# Altium PCB stm32‑smart‑charger.PcbDoc
Units mil, origin at the board's own origin, x right, y up, seen from the top; angles counter-clockwise.
Board outline 3929.13 x 3929.13 mil, 2 copper layers (Top Layer, Bottom Layer); 31 components, 48 nets, 185 pads, 0 vias.
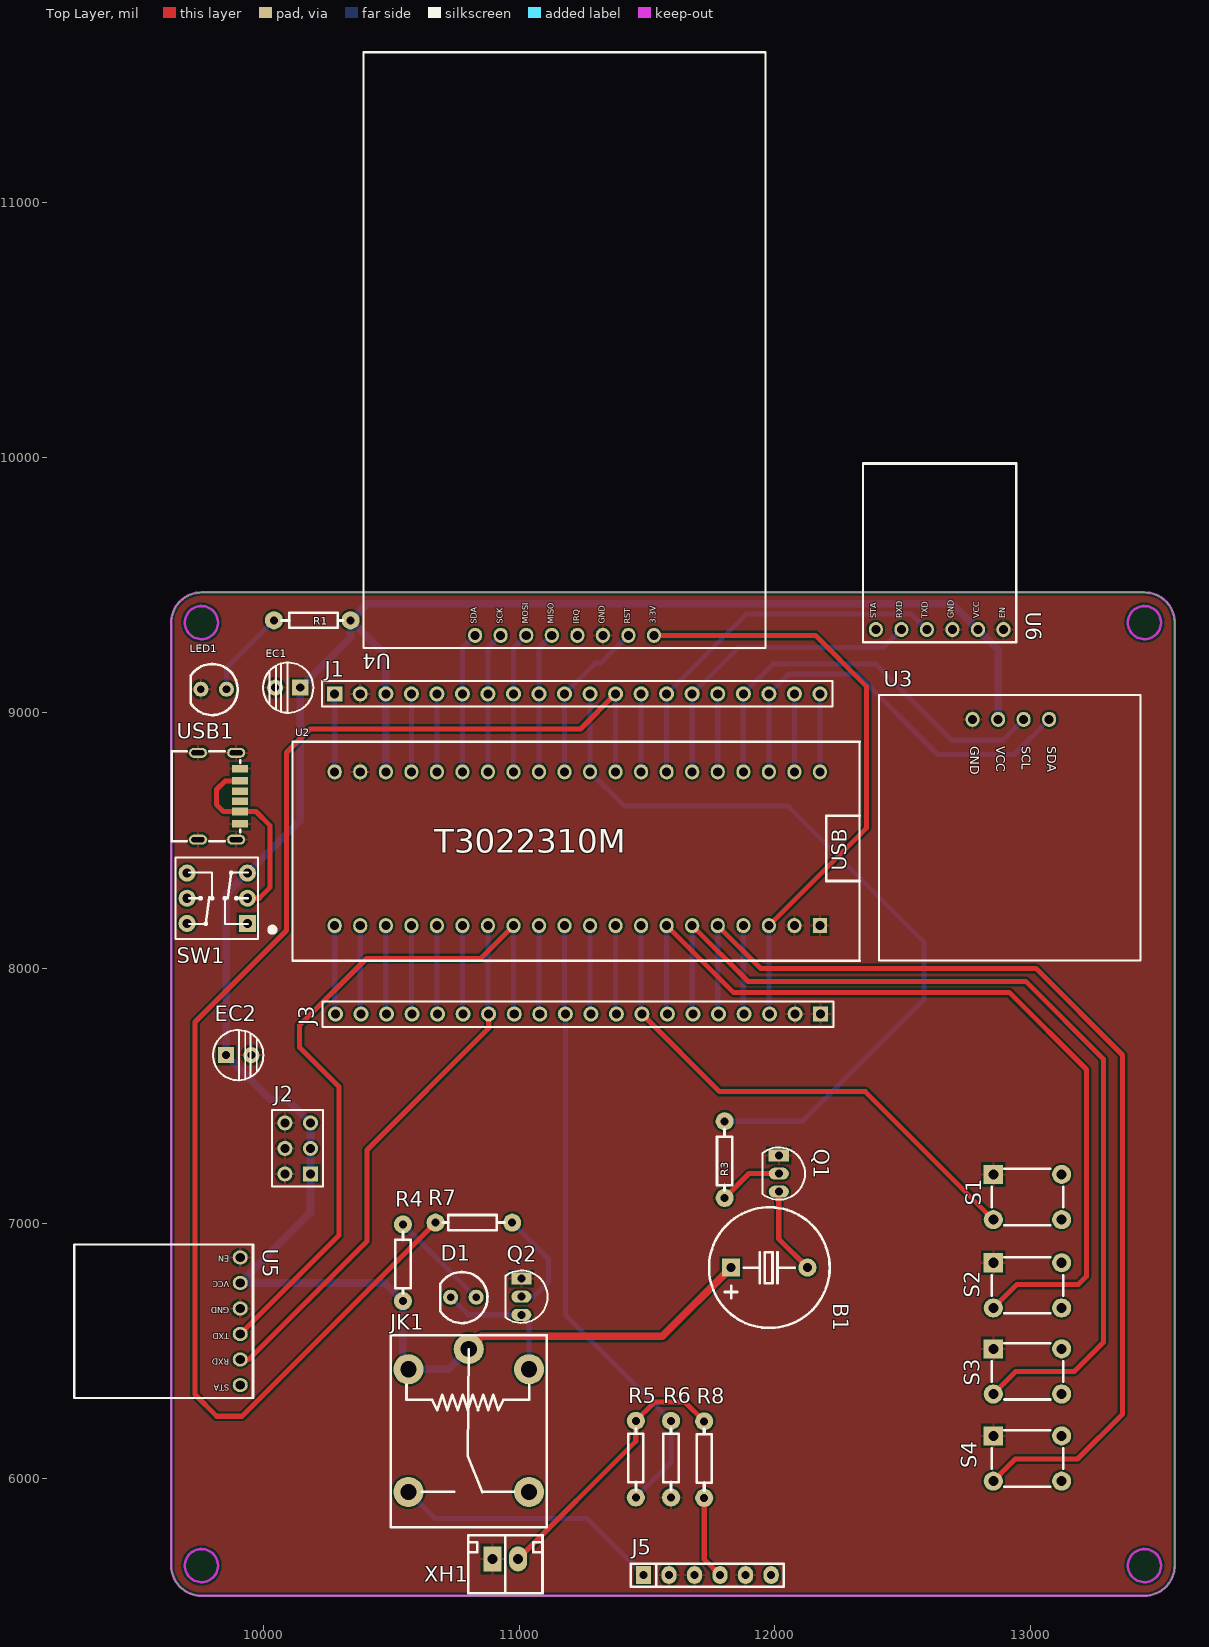
[diagram p0: Top Layer view]
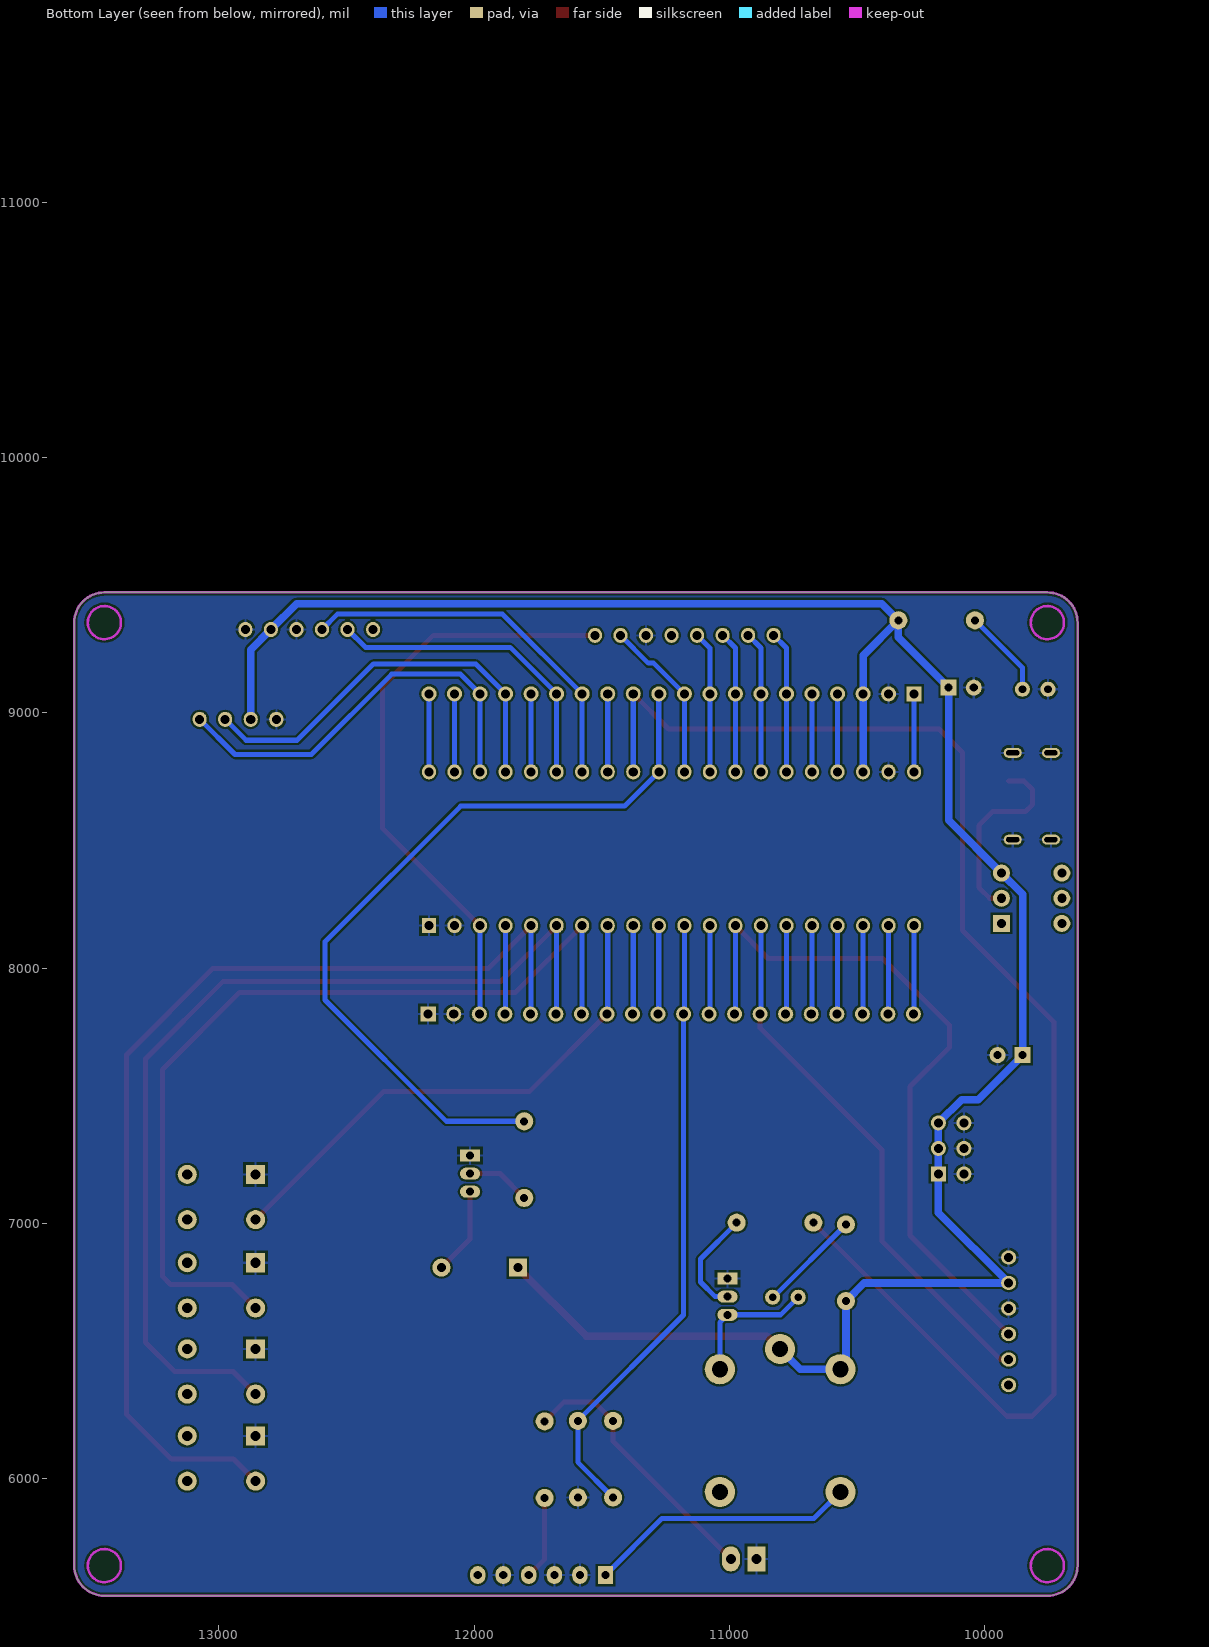
[diagram p1: Bottom Layer view, seen from below]

## Layer stack, top to bottom
Top Layer: signal copper 1.4
Dielectric: dielectric 12.6, FR-4, Dk 4.8
Bottom Layer: signal copper 1.4

## Board outline
9637,5660.11 9637,9353.02 cw(c9755.11,9353.02) 9755.11,9471.13 13448.02,9471.13 cw(c13448.02,9353.02) 13566.13,9353.02 13566.13,5660.11 cw(c13448.02,5660.11) 13448.02,5542 9755.11,5542 cw(c9755.11,5660.11)

## Design rules (kind name [scope] priority, off if disabled: settings)
Clearance [All] p1: gap=8
PolygonConnect [All] p1: connectstyle=Relief reliefconductorwidth=10 reliefentries=4 polygonreliefangle="90 Angle" airgapwidth=10
RoutingVias [All] p1: holewidth=11.81 width=23.62 viastyle="Through Hole" minholewidth=11.81 minwidth=23.62 maxholewidth=11.81 maxwidth=23.62
SolderMaskExpansion [All] p1: expansion=4
Width [All] p1: maxlimit=30 minlimit=20 preferedwidth=20 minimp=50.000000 maximp=50.000000 favimp=50.000000
28 further rules are at their usual default settings.

## Components (designator, comment, footprint, x,y, rotation, side; value= is the part's Value field where it differs from the comment)
B1 "BEEP" "BEEP 7.6X12X7.5" 11829,6827 r0 top
D1 "LED" LED5-BLUE 10781,6711 r180 top
EC1 "22uF" DIP-EC2.5X5X11 10142,9098 r180 top
EC2 "10uF" DIP-EC2.5X5X11 9852,7659 r0 top
J1 "" "Pin HDR1X20/2.54mm-S" 10277,9074 r0 top
J2 "Pin HDR2X3" "Pin HDR2X3/2.54mm-S" 10182,7194 r90 top
J3 "" "Pin HDR1X20/2.54mm-S" 12180,7820 r180 top
J5 "" Fe-HDR1X6/2.54-S 11486,5623 r0 top
JK1 "SRD-05VDC-SL-C" SRD-C_B 11038,6429 r270 top
LED1 "LED" LED5-BLUE 9803,9092 r180 top
Q1 "NPN" TO-92A 12016,7266 r270 top
Q2 "NPN" TO-92A 11008,6784 r270 top
R1 "1k" AXIAL0.3 10039,9362 r0 top
R3 "1K" AXIAL0.3 11804,7400 r270 top
R4 "1k" AXIAL0.3 10544,6996 r270 top
R5 "1k" AXIAL0.3 11456,5927 r90 top
R6 "1k" AXIAL0.3 11594,5927 r90 top
R7 "1k" AXIAL0.3 10972,7003 r180 top
R8 "10k" AXIAL0.3 11724,5925 r90 top
S1 "BUTTOM" DIP-6X6X5 12856,7192 r0 top
S2 "BUTTOM" DIP-6X6X5 12856,6846 r0 top
S3 "BUTTOM" DIP-6X6X5 12856,6509 r0 top
S4 "BUTTOM" DIP-6X6X5 12856,6168 r0 top
SW1 "KFT DIP-8X8" "KFT DIP-8X8" 9935,8175 r180 top
U2 "STM32F103" STM32FF103 12177,8166 r90 top
U3 "OLED" OLED 12920,8974 r270 top
U4 "RC522" RFID-RC522 11177,9303 r90 top
U5 "ECB02" ECB02 9957,6917 r180 top
U6 "SU-03T" ECB02 12946,9276 r90 top
USB1 "TYPEC-250D-BCP6" TYP-C-6 9824,8673 r270 top
XH1 "" XH2/2.54mm/180 10895,5686 r0 top

## Footprints (in the part's own frame and the unit in brackets; to place one, negate y for a bottom-side part, rotate by r counter-clockwise, add the part's x,y. Pads: shape width x height; smd on the part's side, far side on the other; paste and mask are expansions set on the pad)
AXIAL0.3 [mm]
  round 1.8 hole 0.8: 1(0,0) 2(7.62,0)
  silkscreen extent 0.76,-0.76 6.86,0.76, body extent -0.24,-1 7.86,1, height 1.25
"BEEP 7.6X12X7.5" [mm]
  rect 1.8x1.8 hole 0.9: 1(0,0)
  round 1.8 hole 0.9: 2(7.6,0)
  silkscreen extent -2.19,-6 9.81,6, body extent -2.19,-5.97 9.81,6.03, height 7.55
DIP-6X6X5 [mm]
  rect 1.9x1.9 hole 1: 1(0,0)
  round 1.9 hole 1: 2(0,-4.5) 3(6.8,-4.5) 4(6.8,0)
  silkscreen extent -0.16,-5.04 6.96,0.54, body extent -0.8,-5.24 7.41,0.76, height 4.95
DIP-EC2.5X5X11 [mm]
  rect 1.6x1.6 hole 0.8: 1(0,0)
  round 1.6 hole 0.8: 2(2.5,0)
  silkscreen extent -1.3,-2.5 3.7,2.5, body extent -1.25,-2.59 3.75,2.41, height 11.03
ECB02 [mm]
  oval 1.5x1.4 hole 0.9: 1(1.27,13.97) 2(1.27,11.43) 3(1.27,8.89) 4(1.27,6.35) 5(1.27,3.81) 6(1.27,1.27)
  silkscreen extent 0,0 17.78,15.24
Fe-HDR1X6/2.54-S [mil]
  rect 60x70 hole 32: 1(0,0)
  oval 60x70 hole 32: 2(100,0) 3(200,0) 4(300,0) 5(400,0) 6(500,0)
  silkscreen extent -50,-45 550,45, body extent -55,-49 555,49, height 109
"KFT DIP-8X8" [mm]
  rect 1.7x1.7 hole 0.9: 1(0,0)
  round 1.7 hole 0.9: 2(0,-2.5) 3(0,-5) 4(6,-5) 5(6,-2.5) 6(6,0)
  silkscreen extent -2.69,-6.56 7.15,1.56, body extent -1.08,-6.48 6.92,1.52, height 13.1
LED5-BLUE [mm]
  round 1.5 hole 0.762: A(-1.27,0) K(1.27,0)
  silkscreen extent -2.39,-2.51 2.29,2.57, body extent -2.85,-2.85 2.5,2.85, height 8.6
OLED [mm]
  oval 1.5x1.4 hole 0.9: 1(0,-3.683) 2(0,-1.143) 3(0,1.397) 4(0,3.937)
  silkscreen extent -2.41,-13 24,13
"Pin HDR1X20/2.54mm-S" [mm]
  rect 1.5x1.5 hole 0.9: 1(0,0)
  round 1.5 hole 0.9: 2(2.54,0) 3(5.08,0) 4(7.62,0) 5(10.16,0) 6(12.7,0) 7(15.24,0) 8(17.78,0) 9(20.32,0) 10(22.86,0) 11(25.4,0) 12(27.94,0) 13(30.48,0) 14(33.02,0) 15(35.56,0) 16(38.1,0) 17(40.64,0) 18(43.18,0) 19(45.72,0) 20(48.26,0)
  silkscreen extent -1.27,-1.27 49.53,1.27, body extent -1.27,-1.27 49.53,1.27, height 7.58
"Pin HDR2X3/2.54mm-S" [mm] "Connector; Header; 3x2 Position"
  rect 1.5x1.5 hole 0.9: 1(0,0)
  round 1.5 hole 0.9: 2(0,2.54) 3(2.54,0) 4(2.54,2.54) 5(5.08,0) 6(5.08,2.54)
  silkscreen extent -1.27,-1.27 6.35,3.81, body extent -1.27,-1.27 6.35,3.81, height 7.58
RFID-RC522 [mm]
  oval 1.5x1.4 hole 0.9: 1(0,8.89) 2(0,6.35) 3(0,3.81) 4(0,1.27) 5(0,-1.27) 6(0,-3.81) 7(0,-6.35) 8(0,-8.89)
  silkscreen extent -1.27,-20 58,20
SRD-C_B [mm] "单刀双投"
  round 3 hole 1.6: 1(0,0) 2(0,-12) 3(-2,-6) 4(12.2,0) 5(12.2,-12)
  silkscreen extent -3.4,-13.75 15.7,1.75, body extent -3.33,-13.85 15.77,1.65, height 15.6
STM32FF103 [mm]
  rect 1.5x1.4 hole 0.9: 1(0,0)
  oval 1.5x1.4 hole 0.9: 2(0,2.54) 3(0,5.08) 4(0,7.62) 5(0,10.16) 6(0,12.7) 7(0,15.24) 8(0,17.78) 9(0,20.32) 10(0,22.86) 11(0,25.4) 12(0,27.94) 13(0,30.48) 14(0,33.02) 15(0,35.56) 16(0,38.1) 17(0,40.64) 18(0,43.18) 19(0,45.72) 20(0,48.26) 25(15.3,48.26) 26(15.3,45.72) 27(15.3,43.18) 28(15.3,40.64) 29(15.3,38.1) 30(15.3,35.56) 31(15.3,33.02) 32(15.3,30.48) 33(15.3,27.94) 34(15.3,25.4) 35(15.3,22.86) 36(15.3,20.32) 37(15.3,17.78) 38(15.3,15.24) 39(15.3,12.7) 40(15.3,10.16) 41(15.3,7.62) 42(15.3,5.08) 43(15.3,2.54) 44(15.3,0)
  silkscreen extent -3.5,-3.94 18.29,52.45
TO-92A [mm]
  oval 1.2x2 hole 0.8: B(1.8,0) C(3.6,0)
  rect 1.2x2 hole 0.8: E(0,0)
  silkscreen extent -0.8,-1.6 4.4,2.6, body extent -0.5,-1.31 4.1,2.29, height 6.58
TYP-C-6 [mm]
  oval 1x1.8 hole 0.5 slot 1.3 at 90 deg: 1(-4.32,1.7) 2(-4.32,-2.1) 3(4.32,-2.1) 4(4.32,1.7)
  rect 0.75x1.6 smd: A5(-0.5,2.1) A9(1.52,2.1) A12(2.75,2.1) B5(0.5,2.1) B9(-1.52,2.1) B12(-2.75,2.1)
  silkscreen extent -4.48,-4.7 4.47,2.1, body extent -4.47,-4.65 4.48,2.5, height 3.2
XH2/2.54mm/180 [mm]
  rect 1.8x2.5 hole 1: 1(0,0)
  oval 1.8x2.5 hole 1: 2(2.54,0)
  silkscreen extent -2.43,-3.4 4.97,2.35, body extent -2.43,-3.4 4.97,2.35, height 7

## Part data
B1: "蜂鸣器"
EC1 EC2: library part CAP_EC, "极性电容"
J1 J3: library part "Pin HDR1X20"
J5: library part "Female HDR1X6"
JK1: "5V一组转换"
Q1 Q2: "NPN三极管"
R1 R3 R4 R5 R6 R7 R8: library part RES
S1 S2 S3 S4: "按键"
U4: library part RFID-RC522
U6: library part ECB02
XH1: library part XH2

## Nets (pads, with @x,y where several pads share a name; then routed paths per layer and width w, separated by ;. In a path a pad name is that pad's centre, name@x,y a point inside that pad or via, vN(x,y) a via of type N, cw(c..) or ccw(c..) an arc to the next point about the centre after c; other vN are vias at no path point)
+3V3: J3.3 U2.3 U4.8 | length 2353.7
  Top Layer w20: U4.8 12160,9303 12359,9104 12359,8548 U2.3
  Bottom Layer w20: J3.3@11977,7823 U2.3
+5: B1.1 EC1.1 EC2.1 J1.3 J2.1 J2.3 J2.5 JK1.2 JK1.3 R1.2 R4.2 SW1.3 U2.27 U3.2 U5.5 U6.5 | length 9017.3
  Top Layer w30: JK1.3 10852.04,6558 11560,6558 B1.1
  Bottom Layer w30: U2.27 J1.3 10477,9224 R1.2 ; JK1.3 10723.04,6429 JK1.2 10544,6450.56 R4.2 10473,6767 U5.5 10182,7042 J2.1 J2.3 J2.5 10091,7485 10026,7485 EC2.1 9852,8288.85 SW1.3 10142,8578.85 EC1.1 10339,9295 R1.2 ; U3.2 12875,9247 U6.5 12695,9427 10404,9427 R1.2
GND: EC1.2 EC2.2 J1.2 J2.2 J2.4 J2.6 J3.1 J3.2 J5.2 J5.3 J5.5 LED1.K Q1.E Q2.E R6.1 S1.1 S2.1 S3.1 S4.1 U2.1 U2.2 U2.26 U3.1 U4.6 U5.4 U5.6 U6.4 U6.6 USB1.1 USB1.2 USB1.3 USB1.4 USB1.A12 USB1.B12 XH1.1
NetB1_2: B1.2 Q1.C | length 343.7
  Top Layer w20: Q1.C 12016,6939.21 B1.2
NetD1_A: D1.A R4.1 | length 405.1
  Bottom Layer w20: R4.1 10829,6711 D1.A
NetD1_K: D1.K JK1.1 Q2.C | length 531.2
  Bottom Layer w20: D1.K 10799.73,6642.27 Q2.C 11038,6612.27 JK1.1
NetJ1_1: J1.1 U2.25 | length 305.6
  Bottom Layer w20: U2.25 J1.1
NetLED1_A: LED1.A R1.1 | length 347
  Bottom Layer w20: LED1.A 9853,9176 R1.1
NetQ1_B: Q1.B R3.2 | length 251.4
  Top Layer w20: R3.2 11899.13,7195.13 Q1.B
NetQ2_B: Q2.B R7.1 | length 420.8
  Bottom Layer w20: R7.1 11114,6861 11114,6771 11056.13,6713.13 Q2.B
NetR5_2: R5.2 R8.2 XH1.2 | length 1061.3
  Top Layer w20: XH1.2 11456,6147 R5.2 11529,6300 11649,6300 R8.2
PA0: J3.16 U2.16 | length 343
  Bottom Layer w20: J3.16@10677,7823 U2.16
PA1: J3.15 U2.15 | length 343
  Bottom Layer w20: J3.15@10777,7823 U2.15
PA4: J3.12 U2.12 | length 343
  Bottom Layer w20: J3.12@11077,7823 U2.12
PA5: J3.11 R5.1 R6.2 U2.11 | length 2464.6
  Bottom Layer w20: J3.11@11177,7823 U2.11 ; J3.11 11180,6641 R6.2 11594,6065 R5.1
PA6: J3.10 U2.10 | length 343
  Bottom Layer w20: J3.10@11277,7823 U2.10
PA7: J3.9 U2.9 | length 343
  Bottom Layer w20: J3.9@11377,7823 U2.9
PA8: J1.16 U2.40 | length 305.6
  Bottom Layer w20: U2.40 J1.16
PA11: J1.13 U2.37 | length 305.6
  Bottom Layer w20: U2.37 J1.13
PA12: J1.12 R7.2 U2.36 | length 5643.4
  Top Layer w20: R7.2 9914,6245 9815,6245 9730,6330 9730,7789 10088,8147 10088,8844 10180,8936 11239,8936 J1.12
  Bottom Layer w20: U2.36 J1.12
PA15: J1.11 R3.1 U2.35 | length 3093
  Bottom Layer w20: J1.11 U2.35 11411.36,8634 12053,8634 12584,8103 12584,7875 12109,7400 R3.1
PB0: J3.8 S1.2 U2.8 | length 2052.5
  Top Layer w20: J3.8 11784,7516 12354.83,7516 S1.2
  Bottom Layer w20: J3.8@11477,7823 U2.8
PB1: J3.7 S2.2 U2.7 | length 3446.6
  Top Layer w20: U2.7 11838,7905 12919,7905 13221,7603 13221,6793 13189,6761 12948.17,6761 S2.2
  Bottom Layer w20: J3.7@11577,7823 U2.7
PB3: J1.10 U2.34 U4.7 | length 650.5
  Bottom Layer w20: U2.34 J1.10 11297,9194 11318,9194 U4.7
PB4: J1.9 U2.33 U4.4 | length 555.3
  Bottom Layer w20: U2.33 J1.9 11077,9253 U4.4
PB5: J1.8 U2.32 U4.3 | length 555.3
  Bottom Layer w20: U2.32 J1.8 10977,9253 U4.3
PB6: J1.7 U2.31 U4.2 | length 555.3
  Bottom Layer w20: U2.31 J1.7 10877,9253 U4.2
PB7: J1.6 U2.30 U4.1 | length 555.3
  Bottom Layer w20: U2.30 J1.6 10777,9253 U4.1
PB8: J1.5 U2.29 | length 305.6
  Bottom Layer w20: U2.29 J1.5
PB9: J1.4 U2.28 | length 305.6
  Bottom Layer w20: U2.28 J1.4
PB10: J3.6 S3.2 U2.6 | length 3794
  Top Layer w20: U2.6 11895,7948 12983,7948 13287,7644 13287,6534 13173,6420 12944.17,6420 S3.2
  Bottom Layer w20: J3.6@11677,7823 U2.6
PB11: J3.5 S4.2 U2.5 | length 4159.2
  Top Layer w20: U2.5 11945,7998 13024,7998 13362,7660 13362,6253 13186,6077 12942.17,6077 S4.2
  Bottom Layer w20: J3.5@11777,7823 U2.5
PB12: J1.20 U2.44 | length 305.6
  Bottom Layer w20: U2.44 J1.20
PB13: J1.19 U2.43 | length 305.6
  Bottom Layer w20: U2.43 J1.19
PB14: J1.18 U2.42 U3.4 | length 1623.2
  Bottom Layer w20: U2.42 J1.18 12054,9151 12323,9151 12638,8836 12937,8836 U3.4
PB15: J1.17 U2.41 U3.3 | length 1609.9
  Bottom Layer w20: U2.41 J1.17 11994,9191 12395,9191 12694,8892 12893,8892 U3.3
PC13: J3.19 U2.19 | length 343
  Bottom Layer w20: J3.19@10377,7823 U2.19
PC14: J3.18 U2.18 | length 343
  Bottom Layer w20: J3.18@10477,7823 U2.18
PC15: J3.17 U2.17 | length 343
  Bottom Layer w20: J3.17@10577,7823 U2.17
R: J3.4 U2.4 | length 343
  Bottom Layer w20: J3.4@11877,7823 U2.4
RX1: J1.14 U2.38 U6.3 | length 1478.7
  Bottom Layer w20: U2.38 J1.14 11889,9386 12536,9386 U6.3
RX2: J3.13 U2.13 U5.3 | length 2775.2
  Top Layer w20: U5.3 10293,6953 10293,7536 10139,7690 10139,7776 10401,8038 10849,8038 U2.13
  Bottom Layer w20: J3.13@10977,7823 U2.13
TX1: J1.15 U2.39 U6.2 | length 1229
  Bottom Layer w20: U2.39 J1.15 11859,9256 12426,9256 U6.2
TX2: J3.14 U2.14 U5.2 | length 2118.4
  Top Layer w20: U5.2 9940,6467 10403,6930 10403,7288 10880,7765 J3.14
  Bottom Layer w20: J3.14@10877,7823 U2.14
VB: J3.20 U2.20 | length 343
  Bottom Layer w20: J3.20@10277,7823 U2.20
VBAT: J5.4 R8.1 | length 327.7
  Top Layer w20: R8.1 11724,5685 J5.4
VCC: J5.1 JK1.5 | length 1055.3
  Bottom Layer w20: JK1.5 10669.24,5845 11264,5845 J5.1
VIN: SW1.2 USB1.A9 USB1.B9 | length 757.5
  Top Layer w20: USB1.B9 9847.85,8732.85 9814,8699 9814,8640 9840.84,8613.16 USB1.A9 9968.84,8613.16 10023,8559 10023,8315 9981.43,8273.43 SW1.2
pads on no net: J5.6 JK1.4 S1.3 S1.4 S2.3 S2.4 S3.3 S3.4 S4.3 S4.4 SW1.1 SW1.4 SW1.5 SW1.6 U4.5 U5.1 U6.1 USB1.A5 USB1.B5

## Polygon pours and split planes (outlines as drawn)
GND on Top Layer "Bottom Layer-No Net" (solid, remove dead copper, pour order 8): 9432,9744 9447,9729 13863,9729 13863,5133 13817,5087 13669,5235 9362,5235
GND on Bottom Layer "Bottom Layer-No Net" (solid, remove dead copper, pour order 10): 9354,9760 14050,9760 14136,9846 13887,9597 13887,5336 9542,5336 9245,5633

## Keep-outs
Keep-Out Layer:
  circle w10: c9755.11,5660.11 r64.96
  circle w10: c13448.02,5660.11 r64.96
  circle w10: c13448.02,9353.02 r64.96
  circle w10: c9755.11,9353.02 r64.96
  lines w10: 9637,5660.11 ccw(c9755.11,5660.11) 9755.11,5542 13448.02,5542 ccw(c13448.02,5660.11) 13566.13,5660.11 13566.13,9353.02 ccw(c13448.02,9353.02) 13448.02,9471.13 9755.11,9471.13 ccw(c9755.11,9353.02) 9637,9353.02 9637,5660.11

## Text inside footprints (layer, text, board x,y; h text height)
U2: Top Overlay "T3022310M" at 10667,8421 h160; Top Overlay "USB" at 12302,8381 h100 r90
U3: Top Overlay "GND" at 12755,8869 h60 r270; Top Overlay "VCC" at 12855,8869 h60 r270; Top Overlay "SCL" at 12955,8869 h60 r270; Top Overlay "SDA" at 13055,8869 h60 r270
U4: Top Overlay "SDA" at 10842,9348 h40 r90; Top Overlay "SCK" at 10942,9348 h40 r90; Top Overlay "MOSI" at 11042,9348 h40 r90; Top Overlay "MISO" at 11142,9348 h40 r90; Top Overlay "IRQ" at 11242,9348 h40 r90; Top Overlay "GND" at 11342,9348 h40 r90; Top Overlay "3.3V" at 11542,9348 h40 r90; Top Overlay "RST" at 11442,9348 h40 r90
U5: Top Overlay "EN" at 9864,6882 h40 r180; Top Overlay "STA" at 9864,6376 h40 r180; Top Overlay "RXD" at 9864,6477.56 h40 r180; Top Overlay "TXD" at 9864,6578.67 h40 r180; Top Overlay "GND" at 9864,6679.33 h40 r180; Top Overlay "VCC" at 9863.96,6780.44 h40 r180
U6: Top Overlay "EN" at 12911,9369 h40 r90; Top Overlay "STA" at 12405,9369 h40 r90; Top Overlay "RXD" at 12506.56,9369 h40 r90; Top Overlay "TXD" at 12607.67,9369 h40 r90; Top Overlay "GND" at 12708.33,9369 h40 r90; Top Overlay "VCC" at 12809.44,9369.04 h40 r90